# Altium PCB LiIon Charger Protection Board.PcbDoc (part 1 of 2)
Units mil, origin at the board's own origin, x right, y up, seen from the top; angles counter-clockwise.
Board outline 2165.35 x 1377.95 mil, 2 copper layers (Top Layer, Bottom Layer); 64 components, 35 nets, 184 pads, 145 vias.
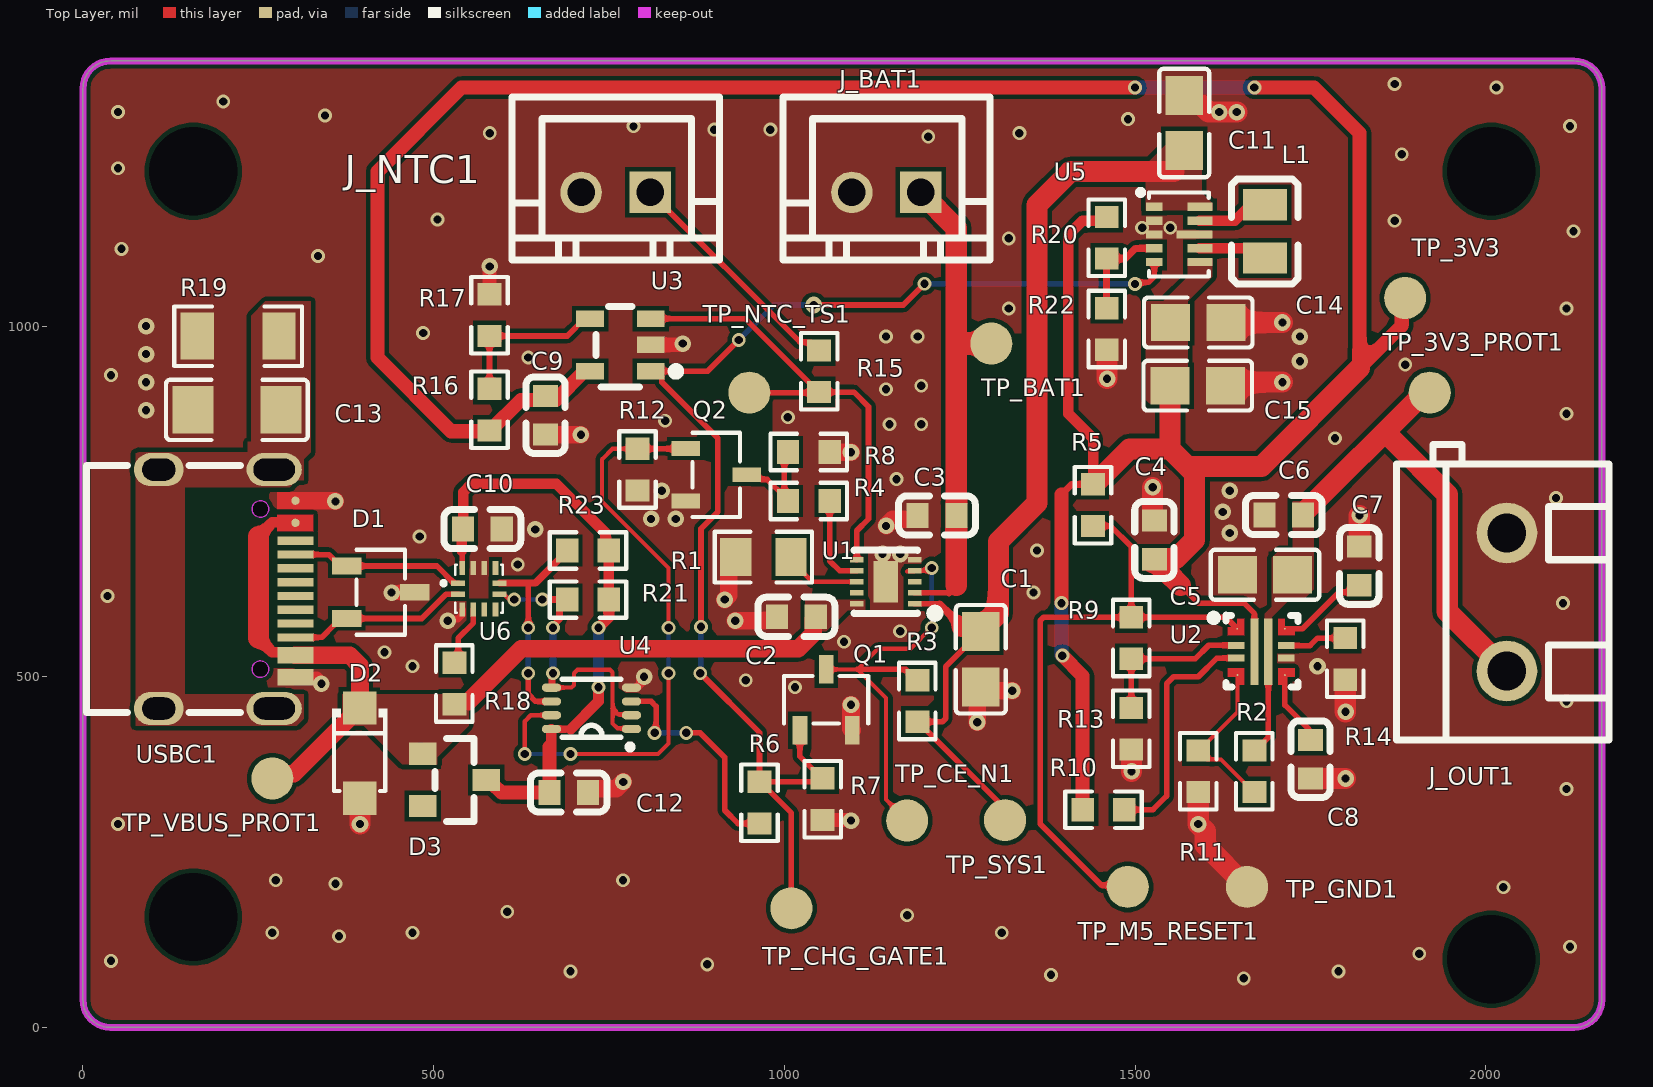
[diagram p0: Top Layer view]
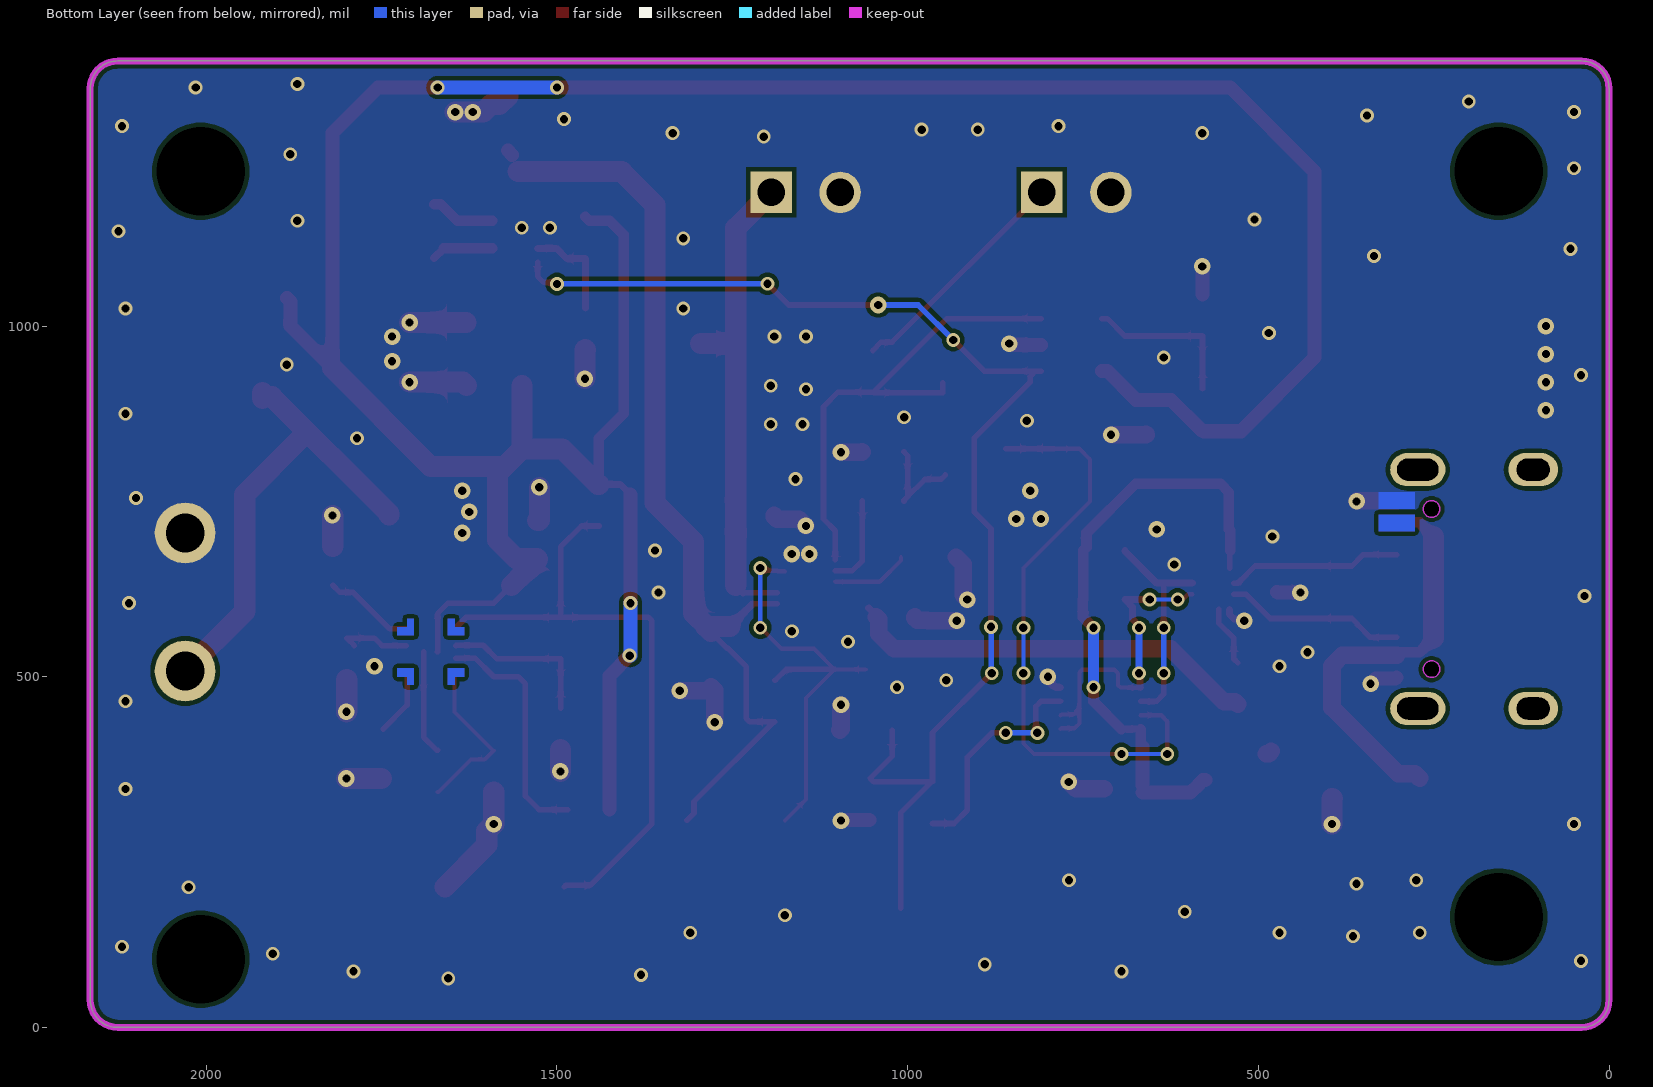
[diagram p1: Bottom Layer view, seen from below]

## Layer stack, top to bottom
Top Solder: solder mask 0.4, Solder Resist, Dk 3.5
Top Layer: signal copper 1.4
Dielectric 1: dielectric 12.6, FR-4, Dk 4.8
Bottom Layer: signal copper 1.4
Bottom Solder: solder mask 0.4, Solder Resist, Dk 3.5

## Board outline
0,39.37 0,1338.58 cw(c39.37,1338.58) 39.37,1377.95 2125.98,1377.95 cw(c2125.98,1338.58) 2165.35,1338.58 2165.35,39.37 cw(c2125.98,39.37) 2125.98,0 39.37,0 cw(c39.37,39.37)

## Design rules (kind name [scope] priority, off if disabled: settings)
Clearance [All] p1: gap=6 ignorepadtopadclearanceinfootprint=FALSE
MinimumSolderMaskSliver [All] p1: minsoldermaskwidth=4
PlaneConnect [All] p1: planeconnectstyle=Direct reliefexpansion=20 reliefentries=4 reliefconductorwidth=10 reliefairgap=10
PolygonConnect PolygonConnect_Power [InNet('VBUS_PROT') Or InNet('SYS') Or InNet('BAT') Or InNet('3V3') Or InNet('3V3_PROT')] p1: connectstyle=Direct reliefconductorwidth=10 reliefentries=4 polygonreliefangle="90 Angle" airgapwidth=6
PolygonConnect [All] p2: connectstyle=Direct reliefconductorwidth=10 reliefentries=4 polygonreliefangle="90 Angle" airgapwidth=6
RoutingVias [All] p1: holewidth=11.81 width=23.62 viastyle="Through Hole" minholewidth=11.81 minwidth=19.68 maxholewidth=19.68 maxwidth=50
SilkToSilkClearance [All] p1: silktosilkclearance=6
SilkToSolderMaskClearance [All] p1: minsilkscreentomaskgap=6 clearancetoexposedcopper=TRUE
SolderMaskExpansion [All] p1: expansion=2 istentingtop=FALSE
Width Width_Power [InNetClass('POWER')] p1: maxlimit=100 minlimit=8 preferedwidth=20 minimp=50.000000 maximp=50.000000 favimp=50.000000
Width Width_Signal_Default [All] p2: maxlimit=40 minlimit=6 preferedwidth=8 minimp=50.000000 maximp=50.000000 favimp=50.000000
26 further rules are at their usual default settings.

## Classes and differential pairs
net class POWER: 3V3 3V3_PROT BAT GND SYS USB_SHIELD VBUS_PROT VDD_CC

## Components (designator, comment, footprint, x,y, rotation, side; value= is the part's Value field where it differs from the comment)
C1 "10uF" C0805 1280,525 r90 top
C2 "2.2uF" C0603 1017.12,585.51 r0 top
C3 "1µF" C0603 1217.56,730 r180 top
C4 "100nF" C0603 1527.44,695.12 r270 top
C5 "10uF" C0805 1685.18,645.51 r0 top
C6 "100nF" C0603 1711.99,730.51 r0 top
C7 "330nF" C0603 1819.56,658.07 r270 top
C8 "2.2nF" C0603 1750,382.56 r90 top
C9 "100nF" C0603 659.55,872.95 r270 top
C10 "100nF" C0603 569.55,710.51 r180 top
C11 "10uF" C0805 1570,1289.37 r270 top
C12 "100nF" C0603 692.56,335 r180 top
C13 "1nF" C1206 219.56,880.51 r0 top
C14 "22uF" C0805 1590,1005 r180 top
C15 "22uF" C0805 1589.37,915 r180 top
D1 "PESD5V0U2BT,215" SOT-23-3_L2.9-W1.6-P1.90-LS2.8-BR 424.56,620.51 r180 top
D2 "SMF6.0A" SOD-123FL_L2.7-W1.8-LS3.8-RD 394.56,391.14 r270 top
D3 "BAT54,215" SOT-23_L2.9-W1.3-P1.90-LS2.4-BR 529.83,352.91 r180 top
J_BAT1 "HX-XH2.54-2PZZ" CONN-TH_2P-P2.50_HX-2.54MM-2P-ZZ-MS 1145.34,1190.51 r180 top
J_NTC1 "HX-XH2.54-2PZZ" CONN-TH_2P-P2.50_HX-2.54MM-2P-ZZ-MS 759.55,1190.51 r180 top
J_OUT1 "KF301-5.0-2P" CONN-TH_P5.00_KF301-5.0-2P 2030,606.58 r90 top
L1 "470nH" IND-SMD_L2.0-W1.6-1 1685,1135 r270 top
Q1 "2N7002BK,215" SOT-23-3_L3.0-W1.7-P0.95-LS2.9-BR 1059.56,467.15 r270 top
Q2 "2N7002BK,215" SOT-23-3_L3.0-W1.7-P0.95-LS2.9-BR 902.91,787.91 r180 top
R1 "600Ω" R0805 970.18,670.51 r180 top
R2 "75kΩ" R0603 1670,365.34 r90 top
R3 "47kΩ" R0603 1189.56,465.51 r270 top
R4 "13kΩ" R0603 1034.89,750.51 r180 top
R5 "100k" R0603 1440,744.66 r270 top
R6 "10kΩ" R0603 964.55,320.51 r90 top
R7 "100 kΩ" R0603 1054.56,325.51 r90 top
R8 "4.99kΩ" R0603 1034.89,820.51 r180 top
R9 "8.25kΩ" R0603 1494.56,555.17 r90 top
R10 "47k" R0603 1454.89,310.51 r180 top
R11 "49.9kΩ" R0603 1590,365.34 r90 top
R12 "100 kΩ" R0603 790.68,795.34 r90 top
R13 "54.9kΩ" R0603 1494.56,425.85 r90 top
R14 "3.32kΩ" R0603 1799.56,525.51 r90 top
R15 "2.7kΩ" R0603 1049.56,935.51 r270 top
R16 "90.9kΩ" R0603 579.55,880.85 r270 top
R17 "10K" R0603 579.55,1015.51 r270 top
R18 "910kΩ" R0603 529.55,490.51 r90 top
R19 "1MΩ" R1206 221.34,985.51 r0 top
R20 "511kΩ" R0603 1459.56,1125.85 r90 top
R21 "100k" R0603 720,610 r180 top
R22 "91kΩ" R0603 1459.56,995.85 r90 top
R23 "100k" R0603 720,680 r0 top
TP_3V3 "" TEST-POINT-0.5MM 1885,1040 r90 top
TP_3V3_PROT1 "" TEST-POINT-0.5MM 1920,905 r90 top
TP_BAT1 "" TEST-POINT-0.5MM 1295,975 r90 top
TP_CE_N1 "" TEST-POINT-0.5MM 1175,295 r90 top
TP_CHG_GATE1 "" TEST-POINT-0.5MM 1010,170 r90 top
TP_GND1 "" TEST-POINT-0.5MM 1659.56,200.51 r90 top
TP_M5_RESET1 "" TEST-POINT-0.5MM 1489.56,200.51 r90 top
TP_NTC_TS1 "" TEST-POINT-0.5MM 950,905 r90 top
TP_SYS1 "" TEST-POINT-0.5MM 1314.56,295.51 r90 top
TP_VBUS_PROT1 "" TEST-POINT-0.5MM 270,355 r90 top
U1 "BQ25185DLHR" WSON-10_L2.2-W2.0-P0.40-BL-EP_TI_DLH0010A 1144.56,635.51 r90 top
U2 "TPS259474LRPWR" VQFN-10_L2.0-W2.0-P0.45-TL 1679.56,535.51 r0 top
U3 "TLV7041DBVR" SOT-23-5_L2.9-W1.6-P0.95-LS2.8-BR 766.25,973.12 r0 top
U4 "SN74LVC2G132DCUR" US-8_L2.4-W2.1-P0.50-LS3.2-BR 725,455 r0 top
U5 "TPS63802DLAR" VSON-10_L3.0-W2.0-P0.50-TL 1559.95,1130.51 r0 top
U6 "TUSB320LAIRWBR" X2QFN-12_L1.6-W1.6-P0.40-TL 564.55,625.51 r0 top
USBC1 "TYPE-C-31-M-12" USB-C_SMD-TYPE-C-31-M-12_1 205.56,625 r270 top

## Footprints (in the part's own frame and the unit in brackets; to place one, negate y for a bottom-side part, rotate by r counter-clockwise, add the part's x,y. Pads: shape width x height; smd on the part's side, far side on the other; paste and mask are expansions set on the pad)
C0603 [mm]
  rect 0.8x0.9 smd: 1(-0.7,0) 2(0.7,0)
  silkscreen extent -1.39,-0.71 1.39,0.71
C0805 [mm]
  rect 1.41x1.35 smd paste-100: 1(-1,0) 2(1,0)
  silkscreen extent -1.96,-0.9 1.96,0.9
C1206 [mm]
  rect 1.485x1.728 smd paste-100: 1(-1.593,0) 2(1.593,0)
  silkscreen extent -2.56,-1.09 2.56,1.09
CONN-TH_2P-P2.50_HX-2.54MM-2P-ZZ-MS [mm]
  rect 1.5x1.5 hole 1: 1(-1.25,0)
  round 1.5 hole 1: 2(1.25,0)
  silkscreen extent -3.75,-3.46 3.75,2.44
CONN-TH_P5.00_KF301-5.0-2P [mm]
  round 2.2 hole 1.4 paste-2539.97: 1(-2.5,0) 2(2.5,0)
  silkscreen extent -5,-3.7 5.71,4
IND-SMD_L2.0-W1.6-1 [mm]
  rect 1.133x1.6 smd: 1(-0.966,0) 2(0.966,0)
  silkscreen extent -1.9,-1.2 1.9,1.2
R0603 [mil]
  rect 31.75x34.02 smd paste-3937.01: 1(-29.66,0) 2(29.66,0)
  silkscreen extent -55,-26 55,26
R0805 [mil]
  rect 44.59x54.21 smd paste-3937.01: 1(-39.37,0) 2(39.37,0)
  silkscreen extent -69,-36 69,36
R1206 [mil]
  rect 47.54x66.97 smd paste-3937.01: 1(-58.22,0) 2(58.22,0)
  silkscreen extent -91,-42 91,42
SOD-123FL_L2.7-W1.8-LS3.8-RD [mm]
  rect 1.2x1.2 smd: 1(-1.635,0) 2(1.635,0)
  silkscreen extent -1.6,-1 1.38,1
SOT-23-3_L2.9-W1.6-P1.90-LS2.8-BR [mm]
  rect 1.07x0.6 smd: 1(1.235,-0.95) 2(1.235,0.95) 3(-1.235,0)
  silkscreen extent -0.88,-1.54 0.88,1.54
SOT-23-3_L3.0-W1.7-P0.95-LS2.9-BR [mil]
  rect 40.85x20.95 smd: 1(43.36,-37.4) 2(43.36,37.4) 3(-43.36,0)
  silkscreen extent -34,-60 34,60
SOT-23-5_L2.9-W1.6-P0.95-LS2.8-BR [mm]
  rect 1x0.6 smd paste+0: 1(1.1,-0.95) 2(1.1,0) 3(1.1,0.95) 4(-1.1,0.95) 5(-1.1,-0.95)
  silkscreen extent -0.89,-1.52 2.16,1.4
SOT-23_L2.9-W1.3-P1.90-LS2.4-BR [mm]
  rect 1x0.8 smd: 1(1.15,-0.95) 2(1.15,0.95) 3(-1.15,0)
  silkscreen extent -0.7,-1.5 0.7,1.5
TEST-POINT-0.5MM [mil]
  round 60 smd: 1(0,0)
US-8_L2.4-W2.1-P0.50-LS3.2-BR [mm]
  oval 0.7x0.3 smd: 1(1.45,-0.75) 2(1.45,-0.25) 3(1.45,0.25) 4(1.45,0.75) 5(-1.45,0.75) 6(-1.45,0.25) 7(-1.45,-0.25) 8(-1.45,-0.75)
  silkscreen extent -1.06,-1.5 1.5,1.05
USB-C_SMD-TYPE-C-31-M-12_1 [mm]
  oval 1.2x2 hole 0.8 slot 1.5 at 90 deg paste-2539.97: 1(4.325,1.706) 4(-4.325,1.706)
  oval 1.2x1.8 hole 0.8 slot 1.2 at 90 deg copper offset 0,0 paste-2539.97: 2(4.325,-2.474) 3(-4.325,-2.474)
  round 0.3 smd: A1B12(-3.2,2.474) A4B9(-2.4,2.474)
  rect 0.3x1.3 smd paste-100: A5(-1.25,2.474) A6(-0.25,2.474) A7(0.25,2.474) A8(1.25,2.474) B5(1.75,2.474) B6(0.75,2.474) B7(-0.75,2.474) B8(-1.75,2.474)
  rect 0.6x1.3 smd paste-100: B1A12(3.2,2.474) B4A9(2.4,2.474)
  Top Layer region: -2.9,1.824 -2.9,3.124 -3.2,3.124 -3.2,3.124 -3.5,3.124 -3.5,1.824 -3.2,1.824 -3.2,1.824 -2.9,1.824
  Top Layer region: -2.1,1.824 -2.1,3.124 -2.4,3.124 -2.4,3.124 -2.7,3.124 -2.7,1.824 -2.4,1.824 -2.4,1.824 -2.1,1.824
  Bottom Layer region: -2.9,1.824 -2.9,3.124 -3.2,3.124 -3.2,3.124 -3.5,3.124 -3.5,1.824 -3.2,1.824 -3.2,1.824 -2.9,1.824
  Bottom Layer region: -2.1,1.824 -2.1,3.124 -2.4,3.124 -2.4,3.124 -2.7,3.124 -2.7,1.824 -2.4,1.824 -2.4,1.824 -2.1,1.824
  Keep-Out Layer board cut-out: -2.6,1.206 -2.6,1.146 -2.646,1.036 -2.73,0.951 -2.84,0.906 -2.96,0.906 -3.07,0.951 -3.154,1.036 -3.2,1.146 -3.2,1.206 -3.2,1.265 -3.154,1.376 -3.07,1.46 -2.96,1.506 -2.84,1.506 -2.73,1.46 -2.646,1.376 -2.6,1.265 -2.6,1.206 -2.6,1.206
  Keep-Out Layer board cut-out: 3.2,1.206 3.2,1.146 3.154,1.036 3.07,0.951 2.96,0.906 2.84,0.906 2.73,0.951 2.646,1.036 2.6,1.146 2.6,1.206 2.6,1.265 2.646,1.376 2.73,1.46 2.84,1.506 2.96,1.506 3.07,1.46 3.154,1.376 3.2,1.265 3.2,1.206 3.2,1.206
  Keep-Out Layer circle w0.003: c-2.9,1.206 r0.3
  Keep-Out Layer circle w0.003: c2.9,1.206 r0.3
  Keep-Out Layer region: -2.6,1.206 -2.6,1.146 -2.646,1.036 -2.73,0.951 -2.84,0.906 -2.96,0.906 -3.07,0.951 -3.154,1.036 -3.2,1.146 -3.2,1.206 -3.2,1.265 -3.154,1.376 -3.07,1.46 -2.96,1.506 -2.84,1.506 -2.73,1.46 -2.646,1.376 -2.6,1.265 -2.6,1.206 -2.6,1.206
  Keep-Out Layer region: -2.6,1.206 -2.609,1.134 -2.634,1.066 -2.675,1.007 -2.729,0.959 -2.794,0.925 -2.864,0.908 -2.936,0.908 -3.006,0.925 -3.07,0.959 -3.124,1.007 -3.166,1.066 -3.191,1.134 -3.2,1.206 -3.191,1.277 -3.166,1.345 -3.124,1.405 -3.07,1.453 -3.006,1.486 -2.936,1.503 -2.864,1.503 -2.794,1.486 -2.729,1.453 -2.675,1.405 -2.634,1.345 -2.609,1.277 -2.6,1.206
  Keep-Out Layer region: 3.2,1.206 3.2,1.146 3.154,1.036 3.07,0.951 2.96,0.906 2.84,0.906 2.73,0.951 2.646,1.036 2.6,1.146 2.6,1.206 2.6,1.265 2.646,1.376 2.73,1.46 2.84,1.506 2.96,1.506 3.07,1.46 3.154,1.376 3.2,1.265 3.2,1.206 3.2,1.206
  Keep-Out Layer region: 3.2,1.206 3.191,1.134 3.166,1.066 3.124,1.007 3.07,0.959 3.006,0.925 2.936,0.908 2.864,0.908 2.794,0.925 2.729,0.959 2.675,1.007 2.634,1.066 2.609,1.134 2.6,1.206 2.609,1.277 2.634,1.345 2.675,1.405 2.729,1.453 2.794,1.486 2.864,1.503 2.936,1.503 3.006,1.486 3.07,1.453 3.124,1.405 3.166,1.345 3.191,1.277 3.2,1.206
  Multi-Layer region: -2.9,1.824 -2.9,3.124 -3.2,3.124 -3.2,3.124 -3.5,3.124 -3.5,1.824 -3.2,1.824 -3.2,1.824 -2.9,1.824
  Multi-Layer region: -2.1,1.824 -2.1,3.124 -2.4,3.124 -2.4,3.124 -2.7,3.124 -2.7,1.824 -2.4,1.824 -2.4,1.824 -2.1,1.824
  silkscreen extent -4.47,-5.09 4.47,0.49
VQFN-10_L2.0-W2.0-P0.45-TL [mm]
  round 0.062 smd: 1(-0.864,0.838) 4(-0.854,-0.838) 7(0.864,-0.838) 10(0.864,0.838)
  rect 0.6x0.25 smd paste+0: 2(-0.905,0.225) 3(-0.905,-0.225) 8(0.905,-0.225) 9(0.905,0.225)
  rect 0.3x2.4 smd paste+0: 5(-0.235,0) 6(0.265,0)
  Top Layer region: 0.865,1.2 0.865,0.9 1.215,0.9 1.215,0.6 0.865,0.6 0.615,0.6 0.615,0.6 0.615,0.9 0.615,0.9 0.615,1.2 0.865,1.2
  Top Layer region: 0.865,-1.2 0.865,-0.9 1.215,-0.9 1.215,-0.6 0.865,-0.6 0.615,-0.6 0.615,-0.6 0.615,-0.9 0.615,-0.9 0.615,-1.2 0.865,-1.2
  Top Layer region: -0.855,-1.2 -0.855,-0.9 -1.205,-0.9 -1.205,-0.6 -0.855,-0.6 -0.605,-0.6 -0.605,-0.6 -0.605,-0.9 -0.605,-0.9 -0.605,-1.2 -0.855,-1.2
  Top Layer region: -0.865,1.2 -0.865,0.9 -1.215,0.9 -1.215,0.6 -0.865,0.6 -0.615,0.6 -0.615,0.6 -0.615,0.9 -0.615,0.9 -0.615,1.2 -0.865,1.2
  Bottom Layer region: 0.865,1.2 0.865,0.9 1.215,0.9 1.215,0.6 0.865,0.6 0.615,0.6 0.615,0.6 0.615,0.9 0.615,0.9 0.615,1.2 0.865,1.2
  Bottom Layer region: 0.865,-1.2 0.865,-0.9 1.215,-0.9 1.215,-0.6 0.865,-0.6 0.615,-0.6 0.615,-0.6 0.615,-0.9 0.615,-0.9 0.615,-1.2 0.865,-1.2
  Bottom Layer region: -0.855,-1.2 -0.855,-0.9 -1.205,-0.9 -1.205,-0.6 -0.855,-0.6 -0.605,-0.6 -0.605,-0.6 -0.605,-0.9 -0.605,-0.9 -0.605,-1.2 -0.855,-1.2
  Bottom Layer region: -0.865,1.2 -0.865,0.9 -1.215,0.9 -1.215,0.6 -0.865,0.6 -0.615,0.6 -0.615,0.6 -0.615,0.9 -0.615,0.9 -0.615,1.2 -0.865,1.2
  Multi-Layer region: 0.865,1.2 0.865,0.9 1.215,0.9 1.215,0.6 0.865,0.6 0.615,0.6 0.615,0.6 0.615,0.9 0.615,0.9 0.615,1.2 0.865,1.2
  Multi-Layer region: 0.865,-1.2 0.865,-0.9 1.215,-0.9 1.215,-0.6 0.865,-0.6 0.615,-0.6 0.615,-0.6 0.615,-0.9 0.615,-0.9 0.615,-1.2 0.865,-1.2
  Multi-Layer region: -0.855,-1.2 -0.855,-0.9 -1.205,-0.9 -1.205,-0.6 -0.855,-0.6 -0.605,-0.6 -0.605,-0.6 -0.605,-0.9 -0.605,-0.9 -0.605,-1.2 -0.855,-1.2
  Multi-Layer region: -0.865,1.2 -0.865,0.9 -1.215,0.9 -1.215,0.6 -0.865,0.6 -0.615,0.6 -0.615,0.6 -0.615,0.9 -0.615,0.9 -0.615,1.2 -0.865,1.2
  silkscreen extent -1.85,-1.28 1.34,1.36
VSON-10_L3.0-W2.0-P0.50-TL [mm]
  rect 0.6x0.3 smd: 1(-0.825,1) 2(-0.825,0.5) 3(-0.825,0) 4(-0.825,-0.5) 5(-0.825,-1)
  rect 0.9x0.3 smd: 6(0.825,-1) 7(0.825,-0.5) 9(0.825,0.5) 10(0.825,1)
  rect 1.3x0.3 smd: 8(0.625,0)
  silkscreen extent -1.42,-1.52 1.14,1.62
WSON-10_L2.2-W2.0-P0.40-BL-EP_TI_DLH0010A [mm]
  rect 0.2x0.5 smd: 1(-0.8,-1.05) 2(-0.4,-1.05) 3(0,-1.05) 4(0.4,-1.05) 5(0.8,-1.05) 6(0.8,1.05) 7(0.4,1.05) 8(0,1.05) 9(-0.4,1.05) 10(-0.8,1.05)
  rect 1.5x0.9 smd: 11(0,0)
  silkscreen extent -1.45,-2.08 1.14,1.14
X2QFN-12_L1.6-W1.6-P0.40-TL [mm]
  rect 0.505x0.2 smd: 1(-0.75,0.2) 2(-0.75,-0.2) 7(0.75,-0.2) 8(0.75,0.2)
  rect 0.2x0.505 smd: 3(-0.6,-0.75) 4(-0.2,-0.75) 5(0.2,-0.75) 6(0.6,-0.75) 9(0.6,0.75) 10(0.2,0.75) 11(-0.2,0.75) 12(-0.6,0.75)
  silkscreen extent -1.35,-0.87 0.86,0.87

## Part data
C1 C5 C11: library part CL21A106KAYNNNE_C15850, "容值:10uF;精度:±10%;额定电压:25V;温度系数:X5R;", JLCPCB Part Class="Basic Part", LCSC Part Name="10uF ±10% 25V", Manufacturer=SAMSUNG(三星), Manufacturer Part=CL21A106KAYNNNE, Temperature Coefficient=X5R, Tolerance=±10%, Voltage Rating=25V, 3D Model=1ba041120af144c991958decab20d241, 3D Model Transform=78.74,51.181,0,0,0,0,0,0.0005,0, Add into BOM=yes, Convert to PCB=yes, Datasheet=https://item.szlcsc.com/datasheet/CL21A106KAYNNNE/16532.html, Device=CL21A106KAYNNNE_C15850, FootprintName=C0805, ModelName=C0805_L2.0-W1.3-H1.3, Supplier=LCSC, Supplier Footprint=0805, Supplier Part=C15850, Symbol=CL21A106KAYNNNE
C2: library part CL10A225KA8NNNC, "容值:2.2uF;精度:±10%;额定电压:25V;温度系数:X5R;", JLCPCB Part Class="Extended Part", LCSC Part Name="2.2uF ±10% 25V", Manufacturer=SAMSUNG(三星), Temperature Coefficient=X5R, Tolerance=±10%, Voltage Rating=25V, 3D Model=ac125912035d415993ca9572d50418b1, 3D Model Transform=62.992,31.496,0,0,0,0,0,0,0, Add into BOM=yes, Convert to PCB=yes, Datasheet=https://item.szlcsc.com/datasheet/CL10A225KA8NNNC/58932.html, Device=CL10A225KA8NNNC, FootprintName=C0603, Manufacturer Part=CL10A225KA8NNNC, ModelName=C0603_L1.6-W0.8-H0.8, Supplier=LCSC, Supplier Footprint=0603, Supplier Part=C57895, Symbol=CL10A225KA8NNNC
C3 C4 C6 C7 C8 C9 C10 C12: library part CAP_0603, AddInBom=yes, ConvertToPcb=yes, Device=CAP_0603, FootprintName=C0603, ModelName=C0603_L1.6-W0.8-H0.8, Supplier Footprint=0603, Symbol=Capacitance
  C3 C9: ModelId=ac125912035d415993ca9572d50418b1聨0819f05c4eef4c71ace90d822a990e87, ModelTransform=62.992,31.496,0,0,0,0,0,0,0
  C4 C6 C7 C8 C10 C12: 3D Model=ac125912035d415993ca9572d50418b1聨0819f05c4eef4c71ace90d822a990e87, 3D Model Transform=62.992,31.496,0,0,0,0,0,0,0
C13: library part GRM31C5C3A102JWA3L, "容值:1nF;精度:±5%;额定电压:1kV;温度系数:C0G;", JLCPCB Part Class="Extended Part", LCSC Part Name="1nF ±5% 1kV", Manufacturer=muRata(村田), Temperature Coefficient=C0G, Tolerance=±5%, Voltage Rating=1kV, AddInBom=yes, ConvertToPcb=yes, Datasheet=https://item.szlcsc.com/datasheet/GRM31C5C3A102JWA3L/538323.html, Device=GRM31C5C3A102JWA3L, FootprintName=C1206, ManufacturerPart=GRM31C5C3A102JWA3L, ModelId=e4be705b945545a48e666415e3682bd8聨0819f05c4eef4c71ace90d822a990e87, ModelName=C1206_L3.2-W1.6-H1.3, ModelTransform=125.984,62.992,0,0,0,0,0,0,0, Supplier=LCSC, Supplier Footprint=1206, SupplierPart=C521240, Symbol=GRM31C5C3A102JWA3L
C14 C15: library part GRM21BR61E226ME44L, "容值:22uF;精度:±20%;额定电压:25V;温度系数:X5R;", JLCPCB Part Class="Extended Part", LCSC Part Name="22uF ±20% 25V", Manufacturer=muRata(村田), Temperature Coefficient=X5R, Tolerance=±20%, Voltage Rating=25V, 3D Model=1ba041120af144c991958decab20d241, 3D Model Transform=78.74,51.181,0,0,0,0,0,0.0005,0, Add into BOM=yes, Convert to PCB=yes, Datasheet=https://item.szlcsc.com/datasheet/GRM21BR61E226ME44L/87993.html, Device=GRM21BR61E226ME44L, FootprintName=C0805, Manufacturer Part=GRM21BR61E226ME44L, ModelName=C0805_L2.0-W1.3-H1.3, Supplier=LCSC, Supplier Footprint=0805, Supplier Part=C86816, Symbol=GRM21BR61E226ME44L
D1: "极性:双向;反向截止电压(Vrwm):5V;击穿电压:5.5V;", JLCPCB Part Class="Extended Part", Junction Capacitance=2.9pF, LCSC Part Name=双向ESD, Manufacturer=Nexperia(安世), Operating Temperature=-65℃~+150℃@(Ta), Reverse Leakage Current (Ir)=5nA, Reverse Stand-Off Voltage (Vrwm)=5V, Voltage - Breakdown=5.5V, AddInBom=yes, ConvertToPcb=yes, Datasheet=https://item.szlcsc.com/datasheet/PESD5V0U2BT%252C215/86572.html, Device=PESD5V0U2BT,215, FootprintName=SOT-23-3_L2.9-W1.6-P1.90-LS2.8-BR, level of protection="IEC 61000-4-2", ManufacturerPart=PESD5V0U2BT,215, ModelId=89cb27a44ab2466697082bb9fd73a7d0聨0819f05c4eef4c71ace90d822a990e87, ModelName=SOT-23-3L_L2.9-W1.6-H1.1-LS2.8-P0.95, ModelTransform=114.173,110.236,0,90,0,0,0,0,0, Number of Channels=双路, Polarity=双向, Supplier=LCSC, Supplier Footprint=SOT-23, SupplierPart=C85399, Symbol=PESD5V0U2BT,215, Type=ESD
D2: library part SMF6.0A_C207260, "极性:单向;反向截止电压(Vrwm):6V;钳位电压:10.3V;峰值脉冲电流(Ipp):19.4A@10/1000us;峰值脉冲功率(Ppp):200W@10/1000us;击穿电压(VBR):7.37V;", Clamping Voltage=10.3V, JLCPCB Part Class="Extended Part", Junction Capacitance=-, LCSC Part Name="VBR=7.37V ，Vc=10.3V， Ipp=19.4A", Manufacturer=Littelfuse(美国力特), Operating Temperature=-65℃~+150℃, Peak Pulse Current (Ipp)=19.4A@10/1000us, Peak Pulse Power Dissipation (Ppp)=200W@10/1000us, Reverse Leakage Current (Ir)=400uA, Reverse Stand-Off Voltage (Vrwm)=6V, Voltage - Breakdown=7.37V, AddInBom=yes, ConvertToPcb=yes, Datasheet=https://item.szlcsc.com/datasheet/SMF6.0A/208379.html, Device=SMF6.0A_C207260, FootprintName=SOD-123FL_L2.7-W1.8-LS3.8-RD, level of protection="IEC 61000-4-4；IEC 61000-4-2", ManufacturerPart=SMF6.0A, ModelId=86f9151e155e4fe2af0c4f2e0a80302e聨0819f05c4eef4c71ace90d822a990e87, ModelName=SOD-123FL_L2.8-W1.8-H1.1-LS3.6, ModelTransform=141.732,70.866,0,180,0,0,0,0,0, Number of Channels=-, Polarity=单向, Supplier=LCSC, Supplier Footprint=SOD-123FL, SupplierPart=C207260, Symbol=SMF6.0A_C207260, Type=TVS
D3: "正向压降(Vf):800mV@100mA;直流反向耐压(Vr):30V;整流电流:200mA;", Current - Rectified=200mA, JLCPCB Part Class="Extended Part", LCSC Part Name="电压:30V 电流:200mA", Manufacturer=Nexperia(安世), Non-Repetitive Peak Forward Surge Current=600mA, Reverse Leakage Current (Ir)=2uA@25V, Voltage - DC Reverse(Vr)=30V, Voltage - Forward(Vf@If)=800mV@100mA, AddInBom=yes, ConvertToPcb=yes, Datasheet=https://item.szlcsc.com/datasheet/BAT54%252C215/86256.html, Device=BAT54,215, FootprintName=SOT-23_L2.9-W1.3-P1.90-LS2.4-BR, ManufacturerPart=BAT54,215, ModelId=c62791f0466c4ae2a892c056b845b0ca聨0819f05c4eef4c71ace90d822a990e87, ModelName=SOT-23-3P_L2.9-W1.3-H1.0-LS2.4-P0.95, ModelTransform=98.64468,114.173,0,180,0,0,0.001,-0.002,0, Supplier=LCSC, Supplier Footprint=SOT-23, SupplierPart=C85084, Symbol=BAT54,215
J_BAT1 J_NTC1: "插针结构:1x2P;间距:2.54mm;安装方式:直插;参考系列:XH;总PIN数:2P;排数:1;每排PIN数:2;行距:-;额定电流:3A;触头材质:黄铜;触头镀层:锡;工作温度:-25℃~+85℃;", Color=白色, Current Rating=3A, Flame Retardant Rating=UL94V-0, JLCPCB Part Class="Extended Part", LCSC Part Name="1x2P 间距:2.54mm 直插 系列:XH", Manufacturer=hanxia(韩下), Operating Temperature=-25℃~+85℃, Voltage Rating=250V, AddInBom=yes, Contact Material=黄铜, Contact Plating=锡, ConvertToPcb=yes, Datasheet=https://item.szlcsc.com/datasheet/HX-XH2.54-2PZZ/44326932.html, Device=HX-XH2.54-2PZZ, FootprintName=CONN-TH_2P-P2.50_HX-2.54MM-2P-ZZ-MS, ModelId=1cafe43f43c04794b29c478db770ea2f聨0819f05c4eef4c71ace90d822a990e87, ModelName=CONN-TH_2P-P2.50_HX-2.54MM-2P-ZZ-MS, ModelTransform=295.275,228.7397,0,0,0,0,0,-19.685,-137.795, Mounting Type=直插, Number of Pins=2P, Number of PINs Per Row=2, Number of Rows=1, Pins Structure=1x2P, Pitch=2.54mm, Plastic Material=PA66, Reference Series=XH, Row Spacing=-, Supplier=LCSC, Supplier Footprint=插件,P=2.5mm, SupplierPart=C42391660, Symbol=HX-XH2.54-2PZZ
  J_BAT1: ManufacturerPart=HX-XH2.54-2PZZ
  J_NTC1: Manufacturer Part=HX-XH2.54-2PZZ
J_OUT1: "结构:1x2P;间距:5mm;颜色:蓝色;安装方式:直插;排数:1;每排PIN数:2;额定电流:17A;额定电压:250V;线规 - AWG:14~22;线规 - 平方毫米:1.5;工作温度:-30℃~+120℃;", Color=蓝色, Current Rating=17A, JLCPCB Part Class="Extended Part", LCSC Part Name="1x2P 5mm 直插 排数:1 每排P数:2", Manufacturer=KEFA(科发), Operating Temperature=-30℃~+120℃, Voltage Rating (Max)=250V, AddInBom=yes, ConvertToPcb=yes, Datasheet=https://item.szlcsc.com/datasheet/KF301-5.0-2P/481499.html, Device=KF301-5.0-2P, FootprintName=CONN-TH_P5.00_KF301-5.0-2P, ManufacturerPart=KF301-5.0-2P, ModelId=442de893d0fc4728b9e5c7abc29ccda5聨0819f05c4eef4c71ace90d822a990e87, ModelName=CONN-TH_P5.00_KF301-5.0-2P, ModelTransform=417.322,299.21594,0,0,0,0,11.811,7.874,-137.795, Mounting Type=直插, Number of Pins=2P, Number of PINs Per Row=2, Number of Positions or Pins=1x2P, Number of Rows=1, Pitch=5mm, Supplier=LCSC, Supplier Footprint=插件,P=5mm, SupplierPart=C474881, Symbol=KF301-5.0-2P, Wire Gauge - AWG=14~22, Wire Gauge - mm2=1.5
L1: library part DFE201612E-R47M=P2, "电感值:470nH;精度:±20%;额定电流:4.5A;饱和电流(Isat):5.5A;", Current - Saturation(Isat)=5.5A, Current Rating=4.5A, DC Resistance(DCR)=26mΩ, JLCPCB Part Class="Extended Part", LCSC Part Name="470nH ±20% 5.5A", Manufacturer=muRata(村田), Manufacturer Part=DFE201612E-R47M=P2, Ratings=-, Tolerance=±20%, 3D Model=e46c02e66e4b482b810d7eae4ef76c7b, 3D Model Transform=78.74,62.992,0,0,0,0,0,-0.003,0, Add into BOM=yes, Convert to PCB=yes, Datasheet=https://atta.szlcsc.com/upload/public/pdf/source/20220704/803E7827D5B93CBE7ABCC328F9E8474C.pdf, Device=DFE201612E-R47M=P2, FootprintName=IND-SMD_L2.0-W1.6-1, ModelName=IND-SMD_L2.0-W1.6-1, Supplier=LCSC, Supplier Footprint=0806, Supplier Part=C668312, Symbol=DFE201612E-R47M=P2
Q1 Q2: "数量:1个N沟道;漏源电压(Vdss):60V;连续漏极电流(Id):350mA;导通电阻(RDS(on)):1.6Ω@10V;耗散功率(Pd):370mW;阈值电压(Vgs(th)):2.1V;", Current - Continuous Drain(Id)=350mA, Drain to Source Voltage=60V, Gate Threshold Voltage (Vgs(th))=2.1V, Input Capacitance(Ciss)=50pF, JLCPCB Part Class="Extended Part", LCSC Part Name="1个N沟道 耐压:60V 电流:350mA", Manufacturer=Nexperia(安世), Operating Temperature=-55℃~+150℃, Pd - Power Dissipation=370mW, Reverse Transfer Capacitance (Crss@Vds)=4pF, AddInBom=yes, ConvertToPcb=yes, Datasheet=https://item.szlcsc.com/datasheet/2N7002BK%252C215/268403.html, Device=2N7002BK,215, FootprintName=SOT-23-3_L3.0-W1.7-P0.95-LS2.9-BR, Gate Charge(Qg)=600pC@4.5V, ManufacturerPart=2N7002BK,215, ModelId=89cb27a44ab2466697082bb9fd73a7d0聨0819f05c4eef4c71ace90d822a990e87, ModelName=SOT-23-3L_L2.9-W1.6-H1.1-LS2.8-P0.95, ModelTransform=114.173,110.236,0,90,0,0,0,0,0, Number=1个N沟道, RDS(on)=1.6Ω@10V, Supplier=LCSC, Supplier Footprint=SOT-23, SupplierPart=C282405, Symbol=2N7002BK,215, Type=N沟道
R1: library part CRCW0805600RFKEAHP, "阻值:600Ω;精度:±1%;功率:500mW;工作电压:150V;温度系数:±100ppm/℃;", JLCPCB Part Class="Extended Part", LCSC Part Name=脉冲耐受、高功率厚膜片式电阻, Manufacturer=VISHAY(威世), Operating Temperature=-55℃~+155℃, Power(Watts)=500mW, Temperature Coefficient=±100ppm/℃, Tolerance=±1%, Voltage-Supply(Max)=150V, 3D Model=37a81e68749a4138bd2dfa6897b24b85, 3D Model Transform=78.74,51.181,0,0,0,0,0,-0.0005,0, Add into BOM=yes, Convert to PCB=yes, Datasheet=https://item.szlcsc.com/datasheet/CRCW0805600RFKEAHP/21048958.html, Device=CRCW0805600RFKEAHP, FootprintName=R0805, Manufacturer Part=CRCW0805600RFKEAHP, ModelName=R0805_L2.0-W1.3-H0.6, Supplier=LCSC, Supplier Footprint=0805, Supplier Part=C19725604, Symbol=CRCW0805600RFKEAHP
R2: library part 0603WAF7502T5E, "电阻类型:厚膜电阻;阻值:75kΩ;精度:±1%;功率:100mW;工作电压:75V;温度系数:±100ppm/℃;", JLCPCB Part Class="Basic Part", LCSC Part Name="75kΩ ±1% 100mW 厚膜电阻", Manufacturer=UNI-ROYAL(厚声), Operating Temperature=-55℃~+155℃, Power(Watts)=100mW, Temperature Coefficient=±100ppm/℃, Tolerance=±1%, Voltage-Supply(Max)=75V, 3D Model=fc143cca1e79419f9cd78b61e9279f08, 3D Model Transform=31.8897,63.7794,0,90,0,0,0,0,0, Add into BOM=yes, Convert to PCB=yes, Datasheet=https://item.szlcsc.com/datasheet/0603WAF7502T5E/23969.html, Device=0603WAF7502T5E, FootprintName=R0603, Manufacturer Part=0603WAF7502T5E, ModelName=R0603, Supplier=LCSC, Supplier Footprint=0603, Supplier Part=C23242, Symbol=0603WAF7502T5E, Type=厚膜电阻
R3: library part FRC0603F4702TS, "电阻类型:厚膜电阻;阻值:47kΩ;精度:±1%;功率:100mW;工作电压:75V;温度系数:±100ppm/℃;", JLCPCB Part Class="Extended Part", LCSC Part Name="47kΩ ±1% 100mW 厚膜电阻", Manufacturer=FOJAN(富捷), Operating Temperature=-55℃~+155℃, Power(Watts)=100mW, Temperature Coefficient=±100ppm/℃, Tolerance=±1%, Voltage-Supply(Max)=75V, 3D Model=fc143cca1e79419f9cd78b61e9279f08, 3D Model Transform=31.8897,63.7794,0,90,0,0,0,0,0, Add into BOM=yes, Convert to PCB=yes, Device=FRC0603F4702TS, FootprintName=R0603, Manufacturer Part=FRC0603F4702TS, ModelName=R0603, Supplier=LCSC, Supplier Footprint=0603, Supplier Part=C2907042, Symbol=FRC0603F4702TS, Type=厚膜电阻
R4: library part 0603WAF1302T5E, "电阻类型:厚膜电阻;阻值:13kΩ;精度:±1%;功率:100mW;工作电压:75V;温度系数:±100ppm/℃;", JLCPCB Part Class="Basic Part", LCSC Part Name="13kΩ ±1% 100mW 厚膜电阻", Manufacturer=UNI-ROYAL(厚声), Operating Temperature=-55℃~+155℃, Power(Watts)=100mW, Temperature Coefficient=±100ppm/℃, Tolerance=±1%, Voltage-Supply(Max)=75V, 3D Model=fc143cca1e79419f9cd78b61e9279f08, 3D Model Transform=31.8897,63.7794,0,90,0,0,0,0,0, Add into BOM=yes, Convert to PCB=yes, Datasheet=https://item.szlcsc.com/datasheet/0603WAF1302T5E/23524.html, Device=0603WAF1302T5E, FootprintName=R0603, Manufacturer Part=0603WAF1302T5E, ModelName=R0603, Supplier=LCSC, Supplier Footprint=0603, Supplier Part=C22797, Symbol=0603WAF1302T5E, Type=厚膜电阻
R5 R6 R7 R10 R12 R17 R21 R23: library part Res_0603, AddInBom=yes, ConvertToPcb=yes, Device=Res_0603, FootprintName=R0603, ModelName=R0603, Supplier Footprint=0603, Symbol=电阻
  R5 R10 R21 R23: 3D Model=fc143cca1e79419f9cd78b61e9279f08聨0819f05c4eef4c71ace90d822a990e87, 3D Model Transform=31.8897,63.7794,0,90,0,0,0,0,0
  R6 R7 R12 R17: ModelId=fc143cca1e79419f9cd78b61e9279f08聨0819f05c4eef4c71ace90d822a990e87, ModelTransform=31.8897,63.7794,0,90,0,0,0,0,0
R8: library part 0603WAF4991T5E, "电阻类型:厚膜电阻;阻值:4.99kΩ;精度:±1%;功率:100mW;工作电压:75V;温度系数:±100ppm/℃;", JLCPCB Part Class="Basic Part", LCSC Part Name="4.99kΩ ±1% 100mW 厚膜电阻", Manufacturer=UNI-ROYAL(厚声), Operating Temperature=-55℃~+155℃, Power(Watts)=100mW, Temperature Coefficient=±100ppm/℃, Tolerance=±1%, Voltage-Supply(Max)=75V, 3D Model=fc143cca1e79419f9cd78b61e9279f08, 3D Model Transform=31.8897,63.7794,0,90,0,0,0,0,0, Add into BOM=yes, Convert to PCB=yes, Datasheet=https://item.szlcsc.com/datasheet/0603WAF4991T5E/23773.html, Device=0603WAF4991T5E, FootprintName=R0603, Manufacturer Part=0603WAF4991T5E, ModelName=R0603, Supplier=LCSC, Supplier Footprint=0603, Supplier Part=C23046, Symbol=0603WAF4991T5E, Type=厚膜电阻
R9: library part FRC0603F8251TS, "电阻类型:厚膜电阻;阻值:8.25kΩ;精度:±1%;功率:100mW;工作电压:75V;温度系数:±100ppm/℃;", JLCPCB Part Class="Extended Part", LCSC Part Name="8.25kΩ ±1% 100mW 厚膜电阻", Manufacturer=FOJAN(富捷), Operating Temperature=-55℃~+155℃, Power(Watts)=100mW, Temperature Coefficient=±100ppm/℃, Tolerance=±1%, Voltage-Supply(Max)=75V, 3D Model=fc143cca1e79419f9cd78b61e9279f08, 3D Model Transform=31.8897,63.7794,0,90,0,0,0,0,0, Add into BOM=yes, Convert to PCB=yes, Datasheet=https://item.szlcsc.com/datasheet/FRC0603F8251TS/3279363.html, Device=FRC0603F8251TS, FootprintName=R0603, Manufacturer Part=FRC0603F8251TS, ModelName=R0603, Supplier=LCSC, Supplier Footprint=0603, Supplier Part=C2933261, Symbol=FRC0603F8251TS, Type=厚膜电阻
R11: library part 0603WAF4992T5E, "电阻类型:厚膜电阻;阻值:49.9kΩ;精度:±1%;功率:100mW;工作电压:75V;温度系数:±100ppm/℃;", JLCPCB Part Class="Basic Part", LCSC Part Name="49.9kΩ ±1% 100mW 厚膜电阻", Manufacturer=UNI-ROYAL(厚声), Operating Temperature=-55℃~+155℃, Power(Watts)=100mW, Temperature Coefficient=±100ppm/℃, Tolerance=±1%, Voltage-Supply(Max)=75V, 3D Model=fc143cca1e79419f9cd78b61e9279f08, 3D Model Transform=31.8897,63.7794,0,90,0,0,0,0,0, Add into BOM=yes, Convert to PCB=yes, Datasheet=https://item.szlcsc.com/datasheet/0603WAF4992T5E/23911.html, Device=0603WAF4992T5E, FootprintName=R0603, Manufacturer Part=0603WAF4992T5E, ModelName=R0603, Supplier=LCSC, Supplier Footprint=0603, Supplier Part=C23184, Symbol=0603WAF4992T5E, Type=厚膜电阻
R13: library part 0603WAF5492T5E, "电阻类型:厚膜电阻;阻值:54.9kΩ;精度:±1%;功率:100mW;最大工作电压:75V;温度系数:±100ppm/℃;", JLCPCB Part Class="Extended Part", LCSC Part Name="54.9kΩ ±1% 100mW 厚膜电阻", Manufacturer=UNI-ROYAL(厚声), Operating Temperature Range=-55℃~+155℃, Overload Voltage (Max)=75V, Power(Watts)=100mW, Temperature Coefficient=±100ppm/℃, Tolerance=±1%, 3D Model=fc143cca1e79419f9cd78b61e9279f08, 3D Model Transform=31.8897,63.7794,0,90,0,0,0,0,0, Add into BOM=yes, Convert to PCB=yes, Datasheet=https://atta.szlcsc.com/upload/public/pdf/source/20200306/C422600_1E6D84923E4A46A82E41ADD87F860B5C.pdf, Device=0603WAF5492T5E, FootprintName=R0603, Manufacturer Part=0603WAF5492T5E, ModelName=R0603, Supplier=LCSC, Supplier Footprint=0603, Supplier Part=C23077, Symbol=0603WAF5492T5E, Type=厚膜电阻
R14: library part FRC0603F3321TS, "电阻类型:厚膜电阻;阻值:3.32kΩ;精度:±1%;功率:100mW;工作电压:75V;温度系数:±100ppm/℃;", JLCPCB Part Class="Extended Part", LCSC Part Name="3.32kΩ ±1% 100mW 厚膜电阻", Manufacturer=FOJAN(富捷), Operating Temperature=-55℃~+155℃, Power(Watts)=100mW, Temperature Coefficient=±100ppm/℃, Tolerance=±1%, Voltage-Supply(Max)=75V, 3D Model=fc143cca1e79419f9cd78b61e9279f08, 3D Model Transform=31.8897,63.7794,0,90,0,0,0,0,0, Add into BOM=yes, Convert to PCB=yes, Device=FRC0603F3321TS, FootprintName=R0603, Manufacturer Part=FRC0603F3321TS, ModelName=R0603, Supplier=LCSC, Supplier Footprint=0603, Supplier Part=C2930088, Symbol=FRC0603F3321TS, Type=厚膜电阻
R15: library part FRC0603F2701TS, "电阻类型:厚膜电阻;阻值:2.7kΩ;精度:±1%;功率:100mW;工作电压:75V;温度系数:±100ppm/℃;", JLCPCB Part Class="Extended Part", LCSC Part Name="2.7kΩ ±1% 100mW 厚膜电阻", Manufacturer=FOJAN(富捷), Operating Temperature=-55℃~+155℃, Power(Watts)=100mW, Temperature Coefficient=±100ppm/℃, Tolerance=±1%, Voltage-Supply(Max)=75V, 3D Model=fc143cca1e79419f9cd78b61e9279f08, 3D Model Transform=31.8897,63.7794,0,90,0,0,0,0,0, Add into BOM=yes, Convert to PCB=yes, Datasheet=https://item.szlcsc.com/datasheet/FRC0603F2701TS/3180521.html, Device=FRC0603F2701TS, FootprintName=R0603, Manufacturer Part=FRC0603F2701TS, ModelName=R0603, Supplier=LCSC, Supplier Footprint=0603, Supplier Part=C2907008, Symbol=FRC0603F2701TS, Type=厚膜电阻
R16: library part FRC0603F9092TS, "电阻类型:厚膜电阻;阻值:90.9kΩ;精度:±1%;功率:100mW;工作电压:75V;温度系数:±100ppm/℃;", JLCPCB Part Class="Extended Part", LCSC Part Name="90.9kΩ ±1% 100mW 厚膜电阻", Manufacturer=FOJAN(富捷), Operating Temperature=-55℃~+155℃, Power(Watts)=100mW, Temperature Coefficient=±100ppm/℃, Tolerance=±1%, Voltage-Supply(Max)=75V, 3D Model=fc143cca1e79419f9cd78b61e9279f08, 3D Model Transform=31.8897,63.7794,0,90,0,0,0,0,0, Add into BOM=yes, Convert to PCB=yes, Datasheet=https://item.szlcsc.com/datasheet/FRC0603F9092TS/3267069.html, Device=FRC0603F9092TS, FootprintName=R0603, Manufacturer Part=FRC0603F9092TS, ModelName=R0603, Supplier=LCSC, Supplier Footprint=0603, Supplier Part=C2930136, Symbol=FRC0603F9092TS, Type=厚膜电阻
R18: library part FRC0603F9103TS, "电阻类型:厚膜电阻;阻值:910kΩ;精度:±1%;功率:100mW;工作电压:75V;温度系数:±100ppm/℃;", JLCPCB Part Class="Extended Part", LCSC Part Name="910kΩ ±1% 100mW 厚膜电阻", Manufacturer=FOJAN(富捷), Operating Temperature=-55℃~+155℃, Power(Watts)=100mW, Temperature Coefficient=±100ppm/℃, Tolerance=±1%, Voltage-Supply(Max)=75V, 3D Model=fc143cca1e79419f9cd78b61e9279f08, 3D Model Transform=31.8897,63.7794,0,90,0,0,0,0,0, Add into BOM=yes, Convert to PCB=yes, Device=FRC0603F9103TS, FootprintName=R0603, Manufacturer Part=FRC0603F9103TS, ModelName=R0603, Supplier=LCSC, Supplier Footprint=0603, Supplier Part=C2907075, Symbol=FRC0603F9103TS, Type=厚膜电阻
R19: library part RC1206FR-071ML, "电阻类型:厚膜电阻;阻值:1MΩ;精度:±1%;功率:250mW;最大工作电压:200V;温度系数:±100ppm/℃;", JLCPCB Part Class="Extended Part", LCSC Part Name="厚膜电阻 1MΩ ±1% 250mW", Manufacturer=YAGEO(国巨), Operating Temperature Range=-55℃~+155℃, Overload Voltage (Max)=200V, Power(Watts)=250mW, Temperature Coefficient=±100ppm/℃, Tolerance=±1%, AddInBom=yes, ConvertToPcb=yes, Datasheet=https://atta.szlcsc.com/upload/public/pdf/source/20180821/C275644_0D56F95EFF785E7D9A1FEF436B37DA78.pdf, Device=RC1206FR-071ML, FootprintName=R1206, ManufacturerPart=RC1206FR-071ML, ModelId=89a1f13db2384da588040e0b3c55bf66聨0819f05c4eef4c71ace90d822a990e87, ModelName=R1206_L3.2-W1.6-H0.6, ModelTransform=125.984,62.992,0,0,0,0,0,0,0, Supplier=LCSC, Supplier Footprint=1206, SupplierPart=C108083, Symbol=RC1206FR-071ML, Type=厚膜电阻
R20: library part FRC0603F5113TS, "电阻类型:厚膜电阻;阻值:511kΩ;精度:±1%;功率:100mW;工作电压:75V;温度系数:±100ppm/℃;", JLCPCB Part Class="Extended Part", LCSC Part Name="511kΩ ±1% 100mW 厚膜电阻", Manufacturer=FOJAN(富捷), Operating Temperature=-55℃~+155℃, Power(Watts)=100mW, Temperature Coefficient=±100ppm/℃, Tolerance=±1%, Voltage-Supply(Max)=75V, 3D Model=fc143cca1e79419f9cd78b61e9279f08, 3D Model Transform=31.8897,63.7794,0,90,0,0,0,0,0, Add into BOM=yes, Convert to PCB=yes, Datasheet=https://item.szlcsc.com/datasheet/FRC0603F5113TS/3267047.html, Device=FRC0603F5113TS, FootprintName=R0603, Manufacturer Part=FRC0603F5113TS, ModelName=R0603, Supplier=LCSC, Supplier Footprint=0603, Supplier Part=C2930114, Symbol=FRC0603F5113TS, Type=厚膜电阻
R22: library part FRC0603F9102TS, "电阻类型:厚膜电阻;阻值:91kΩ;精度:±1%;功率:100mW;工作电压:75V;温度系数:±100ppm/℃;", JLCPCB Part Class="Extended Part", LCSC Part Name="91kΩ ±1% 100mW 厚膜电阻", Manufacturer=FOJAN(富捷), Operating Temperature=-55℃~+155℃, Power(Watts)=100mW, Temperature Coefficient=±100ppm/℃, Tolerance=±1%, Voltage-Supply(Max)=75V, 3D Model=fc143cca1e79419f9cd78b61e9279f08, 3D Model Transform=31.8897,63.7794,0,90,0,0,0,0,0, Add into BOM=yes, Convert to PCB=yes, Device=FRC0603F9102TS, FootprintName=R0603, Manufacturer Part=FRC0603F9102TS, ModelName=R0603, Supplier=LCSC, Supplier Footprint=0603, Supplier Part=C2907077, Symbol=FRC0603F9102TS, Type=厚膜电阻
TP_3V3 TP_3V3_PROT1 TP_BAT1 TP_CE_N1 TP_CHG_GATE1 TP_GND1 TP_M5_RESET1 TP_NTC_TS1 TP_SYS1 TP_VBUS_PROT1: library part Test-Point, "Test Point 测试点", AddInBom=yes, ConvertToPcb=yes, Device=Test-Point, FootprintName=Test-Point-0.5mm, Symbol=Test-Point
U1: "工作电压:3V~18V;最大充电电流:1A;电池类型:锂电池；磷酸铁锂电池;电池节数:1;", Balance Current=-, Battery Temperature Detection=支持, Charge Current - Max=1A, Charging Saturation Voltage=4.4V, End-Off Voltage=2.2V, JLCPCB Part Class="Extended Part", LCSC Part Name=单节1A独立线性电池充电器，具备电源路径、工厂模式和电池跟踪功能, Manufacturer=TI(德州仪器), Operating Temperature=-40℃~+125℃, Supply Current (Iq)=4uA, Voltage - Supply=3V~18V, 0V Battery Charge=-, AddInBom=yes, ConvertToPcb=yes, Datasheet=https://www.ti.com.cn/cn/lit/ds/symlink/bq25185.pdf?ts=1739415017761&ref_url=https%253A%252F%252Fwww.ti.com.cn%252Fproduct%252Fcn%252FBQ25185%253FkeyMatch%253Dbq25185%2526tisearch%253Duniversal_search, Device=BQ25185DLHR, Features=-, FootprintName=WSON-10_L2.2-W2.0-P0.40-BL-EP_TI_DLH0010A, Interface=-, ManufacturerPart=BQ25185DLHR, ModelId=4a262488f9d14eb09b8c4554f47b1590聨0819f05c4eef4c71ace90d822a990e87, ModelName=WSON-10_L2.2-W2.0-P0.40-BL-EP_TI_DLH0010A, ModelTransform=87.4014,79.1337,0,90,0,0,-0.002,0.003,0, Number of Cells=1, Supplier=LCSC, Supplier Footprint=WSON-10-EP(2.2x2), SupplierPart=C19725033, Symbol=BQ25185DLHR, The Chip Type=充电芯片, Type of Battery=锂电池；磷酸铁锂电池
U2: "工作电压:2.7V~23V;", JLCPCB Part Class="Extended Part", Manufacturer=TI(德州仪器), Operating Temperature=-40℃~+125℃, Voltage Rating=2.7V~23V, AddInBom=yes, ConvertToPcb=yes, Datasheet=https://www.ti.com/cn/lit/gpn/tps25947, Device=TPS259474LRPWR, FootprintName=VQFN-10_L2.0-W2.0-P0.45-TL, LCSC Part Name=TPS259474LRPWR, ManufacturerPart=TPS259474LRPWR, ModelId=c74b11dc6301497d8044a28629695f2c聨0819f05c4eef4c71ace90d822a990e87, ModelName=VQFN-10_L2.0-W2.0-P0.45-TL, ModelTransform=79.1337,78.74,0,0,0,0,0,0,0, Supplier=LCSC, Supplier Footprint=VQFN-10-HR(2x2), SupplierPart=C2864845, Symbol=TPS259474LRPWR
U3: "比较器数:单路;输入失调电压(Vos):100uV;输入偏置电流(Ib):2pA;轨到轨:轨到轨输入;", Ib - Input Bias Current=2pA, Input Hysteresis Voltage (Vhys)=7mV, Input Offset Current(Ios)=1pA, JLCPCB Part Class="Extended Part", LCSC Part Name=小尺寸、毫微功耗、低电压比较器, Manufacturer=TI(德州仪器), Maximum Power Supply Range (Vdd-Vss)=7V, Operating Temperature=-40℃~+125℃, Quiescent Current=315nA, Vos - Input Offset Voltage=100uV, 3D Model=7ba65df16e7b4570af156e925f9c37fe聨0819f05c4eef4c71ace90d822a990e87, 3D Model Transform=114.173,114.173,0,90,0,0,0,0,0, AddInBom=yes, Common Mode Rejection Ratio(CMRR)=73dB, ConvertToPcb=yes, Datasheet=https://www.ti.com/cn/lit/ds/symlink/tlv7042.pdf, Device=TLV7041DBVR, Features=-, FootprintName=SOT-23-5_L2.9-W1.6-P0.95-LS2.8-BR, Manufacturer Part=TLV7041DBVR, ModelName=SOT-23-5_L2.9-W1.6-P0.95-LS2.8-BR, Number of Channels=单路, Output Mode=-, Output Type=开漏, Propagation Delay Time=3us, Rail to Rail=轨到轨输入, Response Time (tr)=4.5ns, Single Supply=1.6V~6.5V, Supplier=LCSC, Supplier Footprint=SOT-23-5, Supplier Part=C702122, Symbol=TLV7041DBVR
U4: "逻辑类型:与非门;通道数:2;工作电压:1.65V~5.5V;静态电流(Iq):10uA;传播延迟(tpd):5ns@5V,50pF;", Current - Output High(IOH)=32mA, JLCPCB Part Class="Extended Part", LCSC Part Name=带施密特触发器输入的双2输入与非门, Manufacturer=TI(德州仪器), Operating Temperature=-40℃~+125℃, Quiescent Current=10uA, Voltage - Supply=1.65V~5.5V, AddInBom=yes, ConvertToPcb=yes, Current - Output Low(IOL)=32mA, Datasheet=https://www.ti.com/cn/lit/ds/symlink/sn74lvc2g132.pdf, Device=SN74LVC2G132DCUR, Features=局部关断模式；带电插入保护；后驱动保护, FootprintName=US-8_L2.4-W2.1-P0.50-LS3.2-BR, Input Logic Level - High=1.16V~3.33V, Input Logic Level - Low=390mV~1.87V, Input Number=2, Logic Type=与非门, ManufacturerPart=SN74LVC2G132DCUR, ModelId=263382641c5b4ff3a87f82a73a2b65fc聨0819f05c4eef4c71ace90d822a990e87, ModelName=US-8_L2.0-W2.3-H0.9-LS3.1-P0.50, ModelTransform=130.141,78.74,0,0,0,0,0,0,0, Number of Channels=2, Output Logic Level - High=1.9V；2.4V；2.3V；1.2V；3.8V, Output Logic Level - Low=300mV；400mV；450mV；550mV~650mV, Propagation Delay=5ns@5V,50pF, Series=74LVC系列, Supplier=LCSC, Supplier Footprint=VSSOP-8, SupplierPart=C130201, Symbol=SN74LVC2G132DCUR
U5: library part TPS63802DLAR_C2845237, "功能类型:升降压型;工作电压:1.3V~5.5V;输出电压:1.8V~5.2V;输出电流:2A;输出类型:可调;", Frequency - Switching=2.1MHz；1.4MHz；1.6MHz, JLCPCB Part Class="Extended Part", LCSC Part Name="升降压型 2A 1.3V~5.5V", Manufacturer=TI(德州仪器), Operating Temperature=-40℃~+125℃@(TJ), Output Current=2A, Output Voltage=1.8V~5.2V, Quiescent Current=11uA, Voltage - Supply=1.3V~5.5V, AddInBom=yes, ConvertToPcb=yes, Datasheet=https://www.ti.com/cn/lit/gpn/tps63802, Device=TPS63802DLAR_C2845237, Features=轻载高效模式；过流保护；工作状态指示；负载断开, FootprintName=VSON-10_L3.0-W2.0-P0.50-TL, Function=升降压型, ManufacturerPart=TPS63802DLAR, ModelId=8792291f24e34a10af08ce4e3a8467a6聨0819f05c4eef4c71ace90d822a990e87, ModelName=VSON-10_L3.0-W2.0-P0.50-TL, ModelTransform=78.74,118.11,0,0,0,0,0,0,0, Number of Outputs=1, Output Type=可调, Supplier=LCSC, Supplier Footprint=VSON-10(2x3), SupplierPart=C2845237, Switch tube (built-in/external)=内置, Symbol=TPS63802DLAR, Synchronous Rectifier=是, Topology=降压-升压式
U6: "工作电压:2.7V~5V;最大充电电流:3A;电池类型:-;电池节数:-;", Balance Current=-, Battery Temperature Detection=不支持, Charge Current - Max=3A, JLCPCB Part Class="Extended Part", LCSC Part Name="USB Type-C 配置通道逻辑和端口控制器", Manufacturer=TI(德州仪器), Operating Temperature=-40℃~+85℃, Supply Current (Iq)=70uA, Voltage - Supply=2.7V~5V, 0V Battery Charge=不支持, AddInBom=yes, Charging Saturation Voltage=-, ConvertToPcb=yes, Datasheet=https://www.ti.com/cn/lit/gpn/tusb320lai, Device=TUSB320LAIRWBR, End-Off Voltage=-, Features=可编程充电电流, FootprintName=X2QFN-12_L1.6-W1.6-P0.40-TL, Interface=I2C, ManufacturerPart=TUSB320LAIRWBR, ModelId=44059ae8db6646beab575f8044eac94d聨0819f05c4eef4c71ace90d822a990e87, ModelName=X2QFN-12_L1.6-W1.6-H0.4-P0.40-TL, ModelTransform=62.992,62.992,0,0,0,0,0,0,0, Number of Cells=-, Supplier=LCSC, Supplier Footprint=X2-QFN-12(1.6x1.6), SupplierPart=C132554, Symbol=TUSB320LAIRWBR, The Chip Type=-, Type of Battery=-
USBC1: "连接器类型:Type-C;协议标准:-;公母:母;安装方式:卧贴;触点数量:16P;端口数量:1;额定电流 - 电源:5A;工作温度:-30℃~+80℃;", Current Rating-Power=5A, JLCPCB Part Class="Extended Part", LCSC Part Name="Type-C 母 卧贴", Manufacturer=韩国韩荣, Operating Temperature=-30℃~+80℃, Voltage Rating=20V, AddInBom=yes, Connect-Disconnect Life=1万次, Connector Type=Type-C, ConvertToPcb=yes, Datasheet=https://item.szlcsc.com/datasheet/TYPE-C-31-M-12/177331.html, Device=TYPE-C-31-M-12, FootprintName=USB-C_SMD-TYPE-C-31-M-12_1, Gender=母, Length=7.35mm, ManufacturerPart=TYPE-C-31-M-12, ModelId=2a22bb5af8894b85972aeeacf9cd92d0聨0819f05c4eef4c71ace90d822a990e87, ModelName=USB-C_SMD-TYPE-C-31-M-12_1, ModelTransform=351.9678,311.023,0,180,0,0,0,-43.307,-33.465, Mounting Type=卧贴, Number of Contacts=16P, Number of Ports=1, Protocol Standard=-, Supplier=LCSC, Supplier Footprint=SMD, SupplierPart=C165948, Symbol=TYPE-C-31-M-12

## Free pads (board coordinates)
  round 60 hole 125.98 unplated: 1(157.48,157.48) 1(157.48,1220.47) 1(2007.87,97.48) 1(2007.87,1220.47)

## Via types
v1: diameter 19.68, hole 11.81, Top Layer to Bottom Layer, 99 vias
v2: diameter 23.62, hole 11.81, Top Layer to Bottom Layer, 46 vias

## Nets (pads, with @x,y where several pads share a name; then routed paths per layer and width w, separated by ;. In a path a pad name is that pad's centre, name@x,y a point inside that pad or via, vN(x,y) a via of type N, cw(c..) or ccw(c..) an arc to the next point about the centre after c; other vN are vias at no path point)
3V3: C4.2 C9.1 C14.2 C15.2 R5.1 R10.2 R16.2 R20.2 TP_3V3.1 U2.5 U3.5 U5.6 | length 4501.4
  Top Layer w8: 1565,630 1590,605 1655,605 1670,590 1670,535.82 U2.5
  Top Layer w10: 1395,760 1409.32,774.32 R5.1
  Top Layer w15: R5.1 1440,840 1405,875 1405,1130 1425,1150 1454.04,1150 R20.2
  Top Layer w20: U3.5 715.06,935.71 674.11,894.76 624.26,894.76 580.69,851.19 R16.2 578.36,850 525,850 420,955 420,1220 540,1340 v1(1500,1340) ; v1(1395,605) 1395,760 ; v1(1396.31,530.13) 1425.23,501.21 R10.2 ; v1(1670,1340) 1755,1340 1820,1275 1820,940 1880.07,1000.07 1880.07,1035.07 TP_3V3.1
  Top Layer w30: R5.1 1441.13,774.32 1491.81,825 1550,825 ; C15.2 1550,825 ; 1565,630 C4.2 1528.19,668.31 1558.31,668.31 1585,695 1585,790 1575,800 ; 1820,940 1680,800 1575,800 ; 1550,825 1575,800
  Bottom Layer w20: v1(1395,605) 1395,530 1396.18,530 v1(1396.31,530.13) ; v1(1500,1340) v1(1670,1340)
3V3_PROT: C5.2 C6.2 J_OUT1.1 R2.2 TP_3V3_PROT1.1 U2.6 | length 808.7
  Top Layer w8: R2.2 1671.13,395 1689.98,413.85 U2.6
  Top Layer w30: C6.2 1739.56,732.48 1906.24,899.16 1917.72,899.16 1920,896.88 TP_3V3_PROT1.1 ; 1866.04,838.96 1945,760 1945,593.15 J_OUT1.1
BAT: C3.1 J_BAT1.1 TP_BAT1.1 U1.2 | length 694.8
  Top Layer w8: U1.2 1234.77,619.77
  Top Layer w10: 1234.77,619.77 1245,630
  Top Layer w30: J_BAT1.1 1245,1140.07 1245,975 ; 1245,630 1245,730 1245,765 1245,975 ; TP_BAT1.1 1245,975
CC_OUT1: R21.2 U4.1 U4.2 U4.5 U6.7 | length 477.9
  Top Layer w6: U6.7 600.09,617.64 607.73,610 v1(615,610) ; U4.5 696.49,484.53 700,488.04 700,505 705,510 751.49,510 755,506.49 755,455 ; U4.1 780.98,426.58 761.93,426.58 755,433.51 755,455 ; U4.2 780.98,446.27 763.73,446.27 755,455
  Top Layer w10: v1(655,610) R21.2 679.46,599.12 679.46,582.09 670,572.62 v1(670,570) ; U4.5 668.12,484.53 668.96,485.37 668.96,503.96 v1(670,505)
  Bottom Layer w6: v1(615,610) v1(655,610)
  Bottom Layer w10: v1(670,505) v1(670,570)
CC_OUT2: R23.1 U4.6 U6.8 | length 311.7
  Top Layer w8: v1(635,505) 635,475 645,465 667.75,465 U4.6 ; v1(635,570) 635,633.38
  Top Layer w10: U6.8 635,633.38 644.85,633.38 690.34,678.87 R23.1
  Bottom Layer w8: v1(635,505) v1(635,570)
CE_N: Q1.3 R3.1 TP_CE_N1.1 U1.4 | length 633.2
  Top Layer w6: Q1.3 1104.03,510.51 ; TP_CE_N1.1 1145,325 1145,469.54 1104.03,510.51 ; 1175,650 1175.32,650.32 1184.95,650.32 U1.4 1206.26,651.26 v1(1210,655) ; v1(1210,570) 1180,540 1133.51,540 1104.03,510.51
  Top Layer w8: 1104.03,510.51 1173.08,510.51 1188.42,495.17 R3.1
  Bottom Layer w6: v1@1210,570.36 v1@1210,654.64
CHG_ENABLE_CMD: R6.1 U4.3 | length 323.9
  Top Layer w8: U4.3 810.16,464.84 817.24,457.76 817.24,422.24 v1(815,420) ; v1(860,420) 880,420 915,385 915,309.69 933.83,290.85 R6.1
  Bottom Layer w8: v1(815,420) v1(860,420)
CHG_GATE: Q1.1 R6.2 R7.2 TP_CHG_GATE1.1 U3.1 U5.5 | length 1841.8
  Top Layer w8: v1(880,505) 964.55,420.44 R6.2 ; v1(881.06,571.1) 881.06,711.06 905,735 905,840.28 825.24,920.04 825.24,927.91 817.43,935.72 U3.1 890.72,935.72 v1(935,980) ; TP_CHG_GATE1.1 1010,305.86 965.69,350.17 R6.2 ; Q1.1 1022.15,386.44 1053.42,355.17 1048.42,350.17 R6.2 ; v2(1041.98,1030) 1169.49,1030 v1(1199.74,1060.25) ; v1(1500,1060) 1502.24,1062.24 1519.07,1062.24 1527.46,1070.63 U5.5
  Bottom Layer w8: v1(880,505) 880.53,505.53 880.53,570.57 v1(881.06,571.1) ; v1(935,980) 985,1030 v2(1041.98,1030) ; v1(1199.74,1060.25) 1199.86,1060.12 1499.88,1060.12 v1(1500,1060)
FB_3V3: R20.1 R22.2 U5.4 | length 144.6
  Top Layer w10: R22.2 R20.1 1486.19,1096.19 1500.82,1110.82 U5.4
GND: C1.1 C2.1 C3.2 C4.1 C5.1 C6.1 C7.1 C8.1 C9.2 C10.1 C11.1 C12.1 C13.1 C14.1 C15.1 D1.3 D2.2 J_BAT1.2 J_NTC1.2 J_OUT1.2 Q1.2 Q2.2 R1.2 R7.1 R8.1 R11.1 R12.1 R13.1 R14.1 R17.1 R19.1 R22.1 TP_GND1.1 U1.5 U1.11 U2.8 U3.2 U4.4 U5.2 U5.3 U5.8 U6.3 U6.10 U6.11 USBC1.A1B12 USBC1.B1A12 | length 1486.4
  Top Layer w10: v2(520,580) 522.61,582.61 534.84,582.61 540.93,588.7 U6.3 ; U4.4@782.56,485 U4.4 789.48,484.53 800,495.05 v2(800,500)
  Top Layer w20: USBC1.B1A12 304.78,497.2 332.8,497.2 v2(340,490) ; v2(440,620) 440.26,620.26 472.92,620.26 D1.3 ; R17.1 579.55,1084.56 v2(580,1085) ; U3.2 853.11,973.11 v2(855,975) ; R7.1 1094.15,295.85 v2(1095,295)
  Top Layer w25: USBC1.A1B12 359.02,750.98 v2(360,750) ; C9.2 659.95,845 v2(710,845) ; C12.1@720,340.22 760.22,340.22 v2(770.11,350.11) ; v2(915,610) 921.02,616.02 921.02,660.72 R1.2 ; v2(930,580) 971.66,580 971.96,580.3 986.31,580.3 989.55,583.54 C2.1 ; R8.1 1065.07,820 v2(1095,820) ; v2(1095,460) 1095,425.75 Q1.2 ; v2(1145,715) 1154.78,724.78 1186.75,724.78 1190,728.03 C3.2 ; v2(1275,435) 1275,480.63 C1.1 1285.63,480 v2(1325,480)
  Top Layer w30: D2.2 395,326.33 v2(395,290) ; R22.1 1460,965.75 v2(1460,925) ; R13.1 1495,395.75 v2(1495,365) ; v2(1525,770) 1525,723.43 1525.75,722.68 C4.1 ; C11.1 1570,1327.56 1581.58,1315.98 1594.02,1315.98 1605,1305 v2(1620,1305) v2(1645,1305) ; R11.1 v2(1590,290) 1600,280 1600,260.07 TP_GND1.1 ; C15.1 1633.74,920 v2(1710,920) ; C14.1 v2(1710,1005) ; C8.1 v2(1800,355) ; R14.1 1799.56,450.44 v2(1800,450) ; C7.1 1819.56,729.55 v2(1820,730)
  other v1: 1655,70 1380,75 695,80 1790,80 890,90 40,95 1905,105 2120,115 365,130 270,135 470,135 1310,135 1175,160 605,165 2025,200 360,205 275,210 770,210 50,290 2115,340 2115,465 1015,485 945,495 470,515 430,535 1085,550 1165,565 2110,605 35,615 1355,620 620,660 1360,680 480,700 2100,755 1159.84,781.76 1785,840 1150,860 1195,860 830,865 1005,870 2115,875 1145,910 1195,915 40,930 1885,945 635,955 1145,985 1190,985 485,990 1320,1025 2115,1025 335,1100 55,1110 1320,1125 2125,1135 1510,1140 1550,1140 1870,1150 505.54,1152 50,1225 1880,1245 1205,1270 580,1275 1335,1275 900,1280 980,1280 785,1285 2120,1285 1490,1295 345,1300 50,1305 200,1320 2015,1340 1870,1345
  other v2: 1760,515 1140,675 1165,675 1635,705 645,710 810,725 845,725 1625,735 825,765 1635,765 90,880 90,920 1735,950 90,960 1735,985 90,1000
ILIM_HIGH_CMD: Q2.1 R12.2 U4.7 | length 870.2
  Top Layer w6: v1(630,390) 630,436.65 638.51,445.16 U4.7 ; v1(695,390) 820,390 835,405 v1(835,505) ; R12.2 755,825 740,810 740,750 835,655 v1(835,570)
  Top Layer w8: R12.2 859.87,825 Q2.1
  Bottom Layer w6: v1(630,390) v1(695,390) ; v1(835,505) v1(835,570)
NetC7_2: C7.2 U2.10 | length 131.7
  Top Layer w8: U2.10 1738.51,568.51 1790.32,620.32 1809.36,620.32 C7.2
NetC8_2: C8.2 U2.7 | length 91.1
  Top Layer w8: U2.7 1713.55,459.55 C8.2@1747.59,425.51
NetD1_1: D1.1 U6.1 USBC1.A5 | length 249
  Top Layer w8: USBC1.A5 350.38,674.21 366.68,657.91 D1.1 504.62,657.91 529.15,633.38 U6.1
NetD1_2: D1.2 U6.2 USBC1.B5 | length 258.1
  Top Layer w8: USBC1.B5 340.55,556.1 358.87,574.42 358.87,575.3 366.68,583.11 D1.2 483.11,583.11 517.64,617.64 U6.2
NetJ_NTC1_1: J_NTC1.1 R15.1 | length 334.1
  Top Layer w8: J_NTC1.1 1022.23,977.05 1037.68,977.05 R15.1
NetL1_1: L1.1 U5.9 | length 91.8
  Top Layer w15: U5.9 1641.99,1150.19 1665.35,1173.56 L1.1@1674.56,1173.56
NetL1_2: L1.2 U5.7 | length 87.7
  Top Layer w12: L1.2@1661.2,1110.82 L1.2@1674.56,1097.47
  Top Layer w15: U5.7 L1.2@1661.2,1110.82
NetQ2_3: Q2.3 R4.2 R8.2 | length 140.9
  Top Layer w8: Q2.3 952.75,781.44 975.44,781.44 R4.2@1000,756.88 ; R4.2 1005.24,751.64 R4.2@1000,756.88 ; R8.2 1000,815.28 R4.2@1000,756.88
NetR1_1: R1.1 U1.8 | length 111
  Top Layer w6: R1.1 1009.55,665.7 1039.75,635.51 U1.8
NetR2_1: R2.1 R11.2 U2.4 | length 233.5
  Top Layer w6: 1645.88,500.08 1645.88,449.75 1591.13,395 R11.2 1602.88,382.12 1622.42,382.12 1668.87,335.68 R2.1
NetR4_1: R4.1 U1.7 | length 129.6
  Top Layer w8: R4.1 1064.56,665.45 1078.74,651.26 U1.7
NetR9_1: R9.1 R13.2 U2.2 | length 227.7
  Top Layer w8: R13.2 R9.1 1585.51,525.51 1605,545 1643.3,545 U2.2
NetR10_1: R10.1 U2.3 | length 342.6
  Top Layer w8: R10.1 1525.51,310.51 1545,330 1545,490 1555,500 1590,500 1616.65,526.65 U2.3
NetR14_2: R14.2 U2.9 | length 104.1
  Top Layer w8: U2.9 1749.37,544.37 1760.17,555.17 R14.2 R14.2@1788.76,544.37
NetR18_2: R18.2 U6.4 | length 87
  Top Layer w8: R18.2 535,525.62 535,555 556.68,576.68 U6.4
NTC_TS: R15.2 TP_NTC_TS1.1 U1.6 U3.3 | length 701.4
  Top Layer w8: U3.3 943.76,1010.51 R15.2@1048.42,905.85 ; TP_NTC_TS1.1@950,919.07 TP_NTC_TS1.1 1048.7,905 R15.2 ; R15.2@1050.69,905.85 R15.2 ; U1.6 1103.21,708.22 1120,725 1120,885 1099.15,905.85 R15.2
SYS: C1.2 C11.2 R3.2 TP_SYS1.1 U1.1 U5.1 U5.10 | length 1360.6